# EAGLE board Report1 (EAGLE 9.7.0)

Size 168.67 x 37.84 mm. Coordinates in mm from the lower left corner, seen from the top.
Outline: 0,0 168.67,0 168.67,37.84 0,37.84 0,0
Copper layers (1*16): Top 0.035mm / dielectric 1.5mm / Bottom 0.035mm
Design rules "default": minimum track width 6mil, minimum drill 0.35mm, track to track 6mil, track to pad 6mil, pad to pad 6mil, via to via 6mil, smd to smd 6mil, copper to edge 40mil, drill to drill 6mil, minimum pad ring 10mil, minimum via ring 8mil, stop-mask expansion 4mil, vias tented up to drill 0mil, thermal gap 10mil

## Footprints (pad centres in the part's own frame; a part is rotated, then mirrored left to right if it is on the bottom)
RESAD1016W63L850D250B = drill 0.83 pad 1.43: 1 -5.08,0; 2 5.08,0

## Placement (x,y rotation side)
R1  39k  [RESAD1016W63L850D250B]  8.97,24.11 0 top
R2  1k  [RESAD1016W63L850D250B]  26.75,24.11 0 top
R3  1k  [RESAD1016W63L850D250B]  44.53,24.11 0 top
R4  1k  [RESAD1016W63L850D250B]  62.31,24.11 0 top
R5  1k  [RESAD1016W63L850D250B]  8.97,6.33 0 top
R6  1k  [RESAD1016W63L850D250B]  26.75,6.33 0 top
R7  1k  [RESAD1016W63L850D250B]  44.53,6.33 0 top
R8  1k  [RESAD1016W63L850D250B]  62.31,6.33 0 top
R9  1k  [RESAD1016W63L850D250B]  159.7,31.51 0 top
R10  1k  [RESAD1016W63L850D250B]  110.74,26.32 270 top

## Library data of the parts
R1-R10 = Tinkercad

## Nets
R10_2: R10.1 R10.2

## Tracks (layer width: path | path; a pad name or v marks a point on that pad's centre or on a via)
R10_2  (1 unrouted)